# Altium PCB TuringSMD_BACK.PcbDoc
Units mil, origin at the board's own origin, x right, y up, seen from the top; angles counter-clockwise.
Board outline 1102.36 x 3937.01 mil, 2 copper layers (Top Layer, Bottom Layer); 22 components, 85 nets, 157 pads, 88 vias.
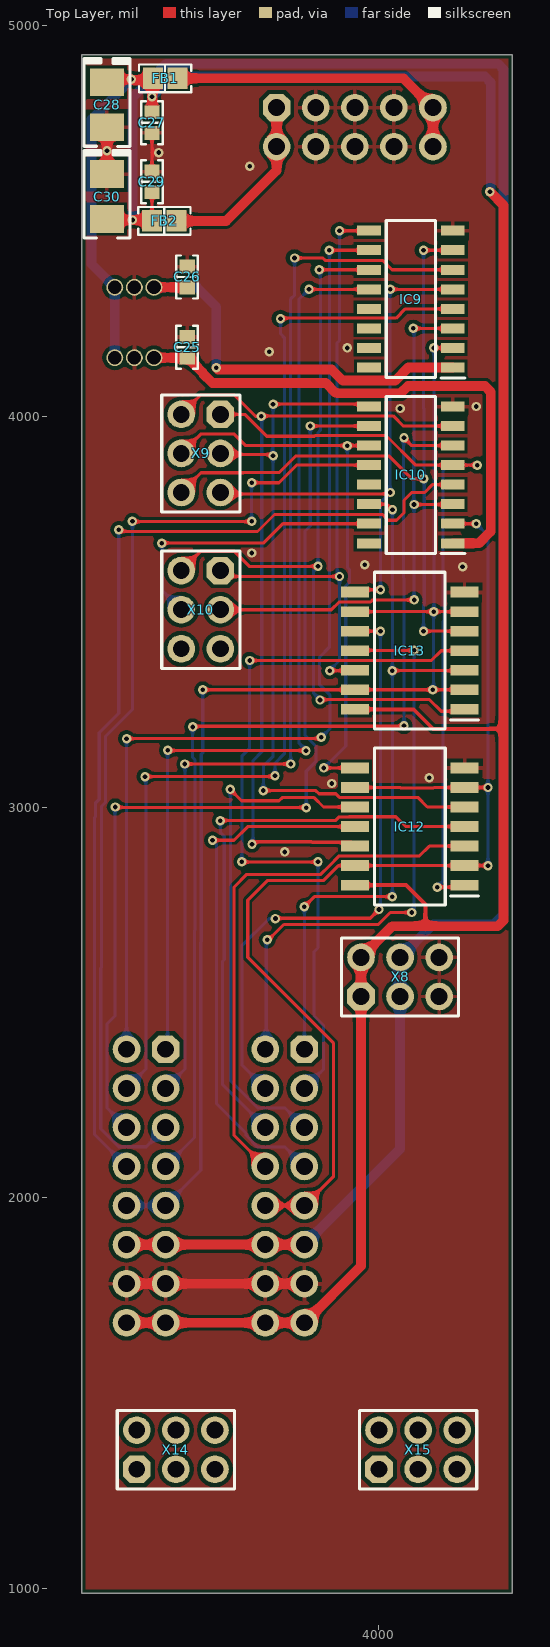
[diagram p0: Top Layer view]
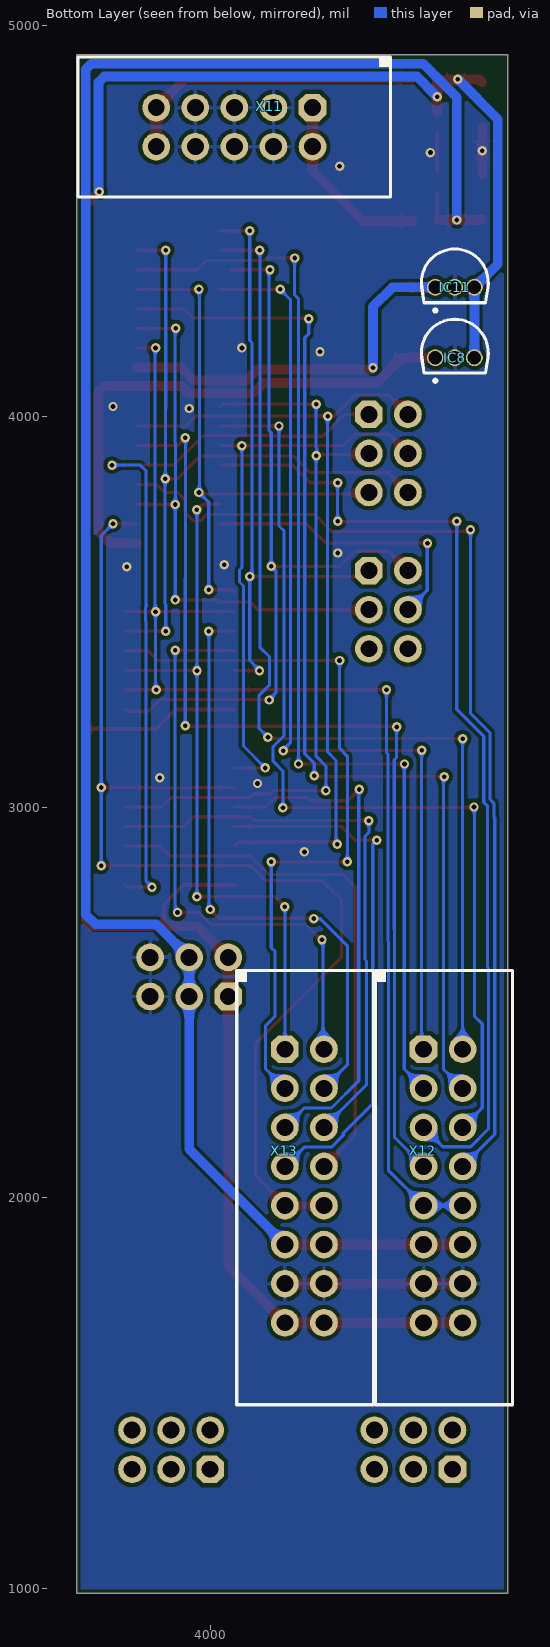
[diagram p1: Bottom Layer view, seen from below]
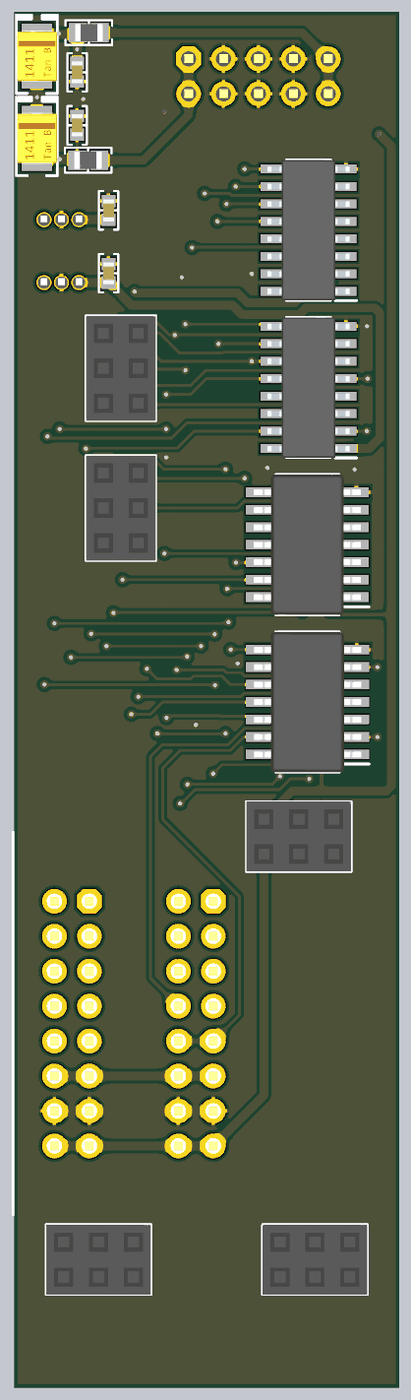
[diagram p2: 3D render of the assembled board from above, using the file's embedded part models]
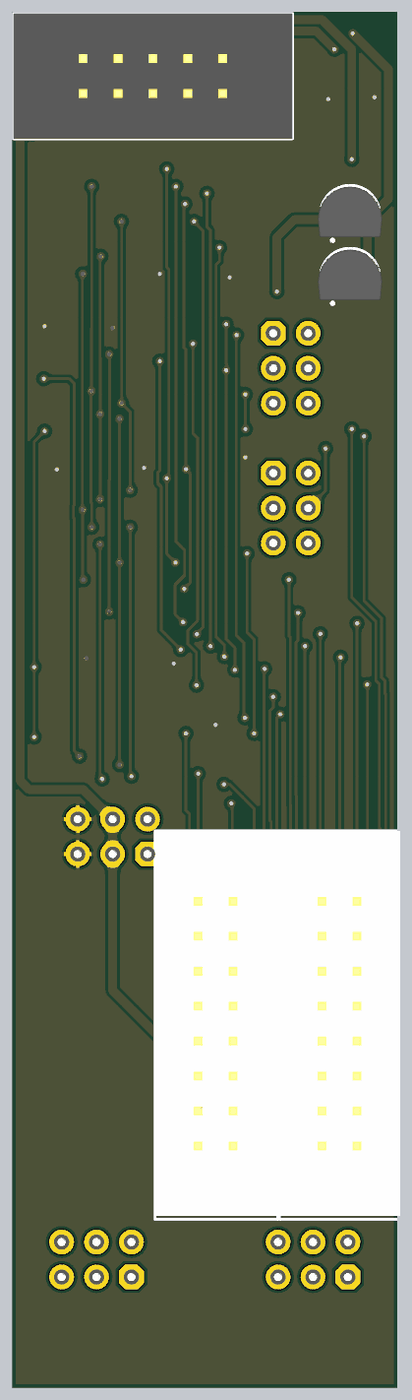
[diagram p3: 3D render of the assembled board from below, using the file's embedded part models]

## Layer stack, top to bottom
Top Solder: solder mask 0.4, Solder Resist, Dk 3.5
Top Layer: signal copper 1.4
Dielectric 1: dielectric 12.6, FR-4, Dk 4.8
Bottom Layer: signal copper 1.4
Bottom Solder: solder mask 0.4, Solder Resist, Dk 3.5

## Board outline
3240,987.99 4342.36,987.99 4342.36,4925 3240,4925

## Design rules (kind name [scope] priority, off if disabled: settings)
BoardOutlineClearance [All] p1: gap=10 ignorepadtopadclearanceinfootprint=FALSE except(0: Arc-SplitContinuation Track-SplitContinuation SMDPad-SplitContinuation THPad-SplitContinuation Via-SplitContinuation Fill-SplitContinuation Poly-SplitContinuation Region-SplitContinuation Text-SplitContinuation)
Clearance [All] p1: gap=10 ignorepadtopadclearanceinfootprint=FALSE except(7: Arc-SMDPad Track-SMDPad; 8: Arc-Arc Arc-Track Arc-Fill Arc-Poly Arc-Region Track-Track Track-Fill Track-Poly Track-Region SMDPad-SMDPad SMDPad-Fill SMDPad-Poly SMDPad-Region)
PolygonConnect [All] p1: thpad.connectstyle=Relief thpad.reliefconductorwidth=10 thpad.reliefentries=4 thpad.polygonreliefangle="90 Angle" thpad.airgapwidth=10 smdpad.connectstyle=Relief smdpad.reliefconductorwidth=10 smdpad.reliefentries=4 smdpad.polygonreliefangle="90 Angle" smdpad.airgapwidth=10 via.connectstyle=Direct via.reliefconductorwidth=10 via.reliefentries=4 via.polygonreliefangle="90 Angle" via.airgapwidth=10
RoutingVias [All] p1: holewidth=12 width=24 viastyle="Through Hole" minholewidth=12 minwidth=24 maxholewidth=12 maxwidth=24
SolderMaskExpansion [All] p1: expansion=4 istentingtop=FALSE
Width [All] p1: maxlimit=25 minlimit=8 preferedwidth=8
30 further rules are at their usual default settings.

## Classes and differential pairs
component class TuringSMD_back: C25 C26 C27 C28 C29 C30 FB1 FB2 IC8 IC9 IC10 IC11 IC12 IC13 X8 X9 X10 X11 X12 X13

## Components (designator, comment, footprint, x,y, rotation, side; value= is the part's Value field where it differs from the comment)
C25 "0.1 µF" "CAP 0603_1608" 3510,4176.57 r270 top
C26 "0.1 µF" "CAP 0603_1608" 3510,4356.57 r270 top
C27 "0.1 µF" "CAP 0603_1608" 3420,4751.57 r90 top
C28 "10µF" "CAP POL 1411_3528" 3305,4797.52 r270 top
C29 "0.1 µF" "CAP 0603_1608" 3420,4600 r90 top
C30 "10µF" "CAP POL 1411_3528" 3305,4562.52 r270 top
FB1 "470 Ohms @ 100MHz" "FER 0805_2012" 3453.5,4865 r0 top
FB2 "470 Ohms @ 100MHz" "FER 0805_2012" 3451.5,4500 r0 top
IC8 "L78L09ACZTR" TS1107A1AP 3425,4150 r180 bottom
IC9 "CD4050BD" SOIC127P600X175-16N 4082.72,4300 r180 top
IC10 "CD4050BD" SOIC127P600X175-16N 4082.72,3850 r180 top
IC11 "L78L09ACZTR" TS1107A1AP 3425,4330 r180 bottom
IC12 "CD4081BNSRG4" SOIC127P780X200-14N 4080,2950 r180 top
IC13 "CD4081BNSRG4" SOIC127P780X200-14N 4079.76,3400 r180 top
X8 "Connector, 6pin, 2.54mm, 500VAC, 3A" "CON: PBD-6"#1 4055,2565 r0 top
X9 "Connector, 6pin, 2.54mm, 500VAC, 3A" "CON: PBD-6"#2 3545,3905 r270 top
X10 "Connector, 6pin, 2.54mm, 500VAC, 3A" "CON: PBD-6"#2 3545,3505 r270 top
X11 "Connector, 10pin, 2.54mm, 250VAC, 3A" "CON: IDC-10MS" 3939.21,4740 r0 bottom
X12 "Connector, 16pin, 2.54mm, 250VAC, 3A" "CON: IDC-16MS" 3405,2030 r270 bottom
X13 "Connector, 16pin, 2.54mm, 250VAC, 3A" "CON: IDC-16MS" 3760,2030 r270 bottom
X14 "Connector, 6pin, 2.54mm, 500VAC, 3A" "CON: PBD-6"#1 3481.14,1355 r0 top (schematic designator X8)
X15 "Connector, 6pin, 2.54mm, 500VAC, 3A" "CON: PBD-6"#1 4101.22,1355 r0 top (schematic designator X8)

## Footprints (in the part's own frame and the unit in brackets; to place one, negate y for a bottom-side part, rotate by r counter-clockwise, add the part's x,y. Pads: shape width x height; smd on the part's side, far side on the other; paste and mask are expansions set on the pad)
"CAP 0603_1608" [mm] "Chip Capacitor, 2-Leads, Body 1.60x0.80mm, IPC Medium Density"
  rect 0.9x1 smd: 1(-0.675,0) 2(0.675,0)
  silkscreen extent -1.4,-0.7 1.4,0.7, body extent -0.8,-0.41 0.8,0.41, height 0.82
"CAP POL 1411_3528" [mm] "Molded Capacitor, 2-Leads, Body 3.50x2.80mm, IPC Medium Density"
  rect 1.8x2.23 smd: 1(-1.46,0) 2(1.46,0)
  silkscreen extent -3,-1.5 2.71,1.48, body extent -1.87,-1.45 1.86,1.45, height 2
"CON: IDC-10MS" [mm] "IDC-10MS 10 pin PCB-mount header"
  oct 1.8x1.8 hole 1.1: 1(-5.08,-1.27)
  round 1.8 hole 1.1: 2(-5.08,1.27) 3(-2.54,-1.27) 4(-2.54,1.27) 5(0,-1.27) 6(0,1.27) 7(2.54,-1.27) 8(2.54,1.27) 9(5.08,-1.27) 10(5.08,1.27)
  round 0.5 on Mech1: ""(-9.6,-4)
  silkscreen extent -10.14,-4.57 10.16,4.53, body extent -10.14,-4.57 10.16,4.53, height 9
"CON: IDC-16MS" [mm] "IDC-16MS straight leads pcb mount"
  oct 1.8x1.8 hole 1.1: 1(-8.89,-1.27)
  round 1.8 hole 1.1: 2(-8.89,1.27) 3(-6.35,-1.27) 4(-6.35,1.27) 5(-3.81,-1.27) 6(-3.81,1.27) 7(-1.27,-1.27) 8(-1.27,1.27) 9(1.27,-1.27) 10(1.27,1.27) 11(3.81,-1.27) 12(3.81,1.27) 13(6.35,-1.27) 14(6.35,1.27) 15(8.89,-1.27) 16(8.89,1.27)
  round 0.5 on Mech1: ""(-13.5,-3.9)
  silkscreen extent -14,-4.4 14.22,4.5, body extent -13.98,-4.4 13.99,4.4, height 9.1
"CON: PBD-6"#1 [mm] "PBD-6"
  oct 1.8x1.8 hole 1.1: 1(-2.54,-1.27)
  round 1.8 hole 1.1: 2(-2.54,1.27) 3(0,-1.27) 4(0,1.27) 5(2.54,-1.27) 6(2.54,1.27)
  silkscreen extent -3.81,-2.54 3.81,2.54, body extent -3.81,-2.54 3.81,2.54, height 8.5
"CON: PBD-6"#2 [mm] "PBD-6"
  oct 1.8x1.8 hole 1.1: 1(-2.54,1.27)
  round 1.8 hole 1.1: 2(-2.54,-1.27) 3(0,1.27) 4(0,-1.27) 5(2.54,1.27) 6(2.54,-1.27)
  silkscreen extent -3.81,-2.54 3.81,2.54, body extent -3.81,-2.54 3.81,2.54, height 8.5
"FER 0805_2012" [mm] "Chip Ferrite, 2-Leads, Body 2.00x1.20mm, IPC Medium Density"
  rect 1.3x1.4 smd: 1(-0.8,0) 2(0.8,0)
  silkscreen extent -1.7,-0.9 1.7,0.9, body extent -1,-0.64 1,0.64, height 1.26
SOIC127P600X175-16N [mm]
  rect 1.55x0.65 smd: 1(-2.725,4.445) 2(-2.725,3.175) 3(-2.725,1.905) 4(-2.725,0.635) 5(-2.725,-0.635) 6(-2.725,-1.905) 7(-2.725,-3.175) 8(-2.725,-4.445) 9(2.725,-4.445) 10(2.725,-3.175) 11(2.725,-1.905) 12(2.725,-0.635) 13(2.725,0.635) 14(2.725,1.905) 15(2.725,3.175) 16(2.725,4.445)
  silkscreen extent -3.5,-5.1 1.6,5.12, body extent -3,-5.1 3,5.1, height 1.75
SOIC127P780X200-14N [mm]
  rect 1.825x0.7 smd: 1(-3.562,3.81) 2(-3.562,2.54) 3(-3.562,1.27) 4(-3.562,0) 5(-3.562,-1.27) 6(-3.562,-2.54) 7(-3.562,-3.81) 8(3.562,-3.81) 9(3.562,-2.54) 10(3.562,-1.27) 11(3.562,0) 12(3.562,1.27) 13(3.562,2.54) 14(3.562,3.81)
  silkscreen extent -4.47,-5.1 2.3,5.1, body extent -3.9,-5.1 3.9,5.1, height 2
TS1107A1AP [mm]
  round 1.1 hole 0.89: 1(0,0) 2(1.27,0) 3(2.54,0)
  silkscreen extent -0.9,-1.6 3.44,2.5, body extent -1.08,-1.29 3.62,2.41, height 7.2

## Part data
C25 C26 C27 C29: library part C0603C104K5RAC7411, "CAP CER 0.1UF 50V X7R 0603", Device Package="0603 (1608 Metric)", Manufacturer=KEMET, Operating Temperature="-55°C ~ 125°C", Supplier Part Number 1=399-C0603C104K5RAC7411CT-ND, Temperature Coefficient=X7R, Tolerance=±10%, Voltage - Rated=50V, Applications="Bypass, Decoupling", Capacitance="0.1 µF", ComponentLink1Description=Datasheet, ComponentLink1URL=https://api.kemet.com/component-edge/download/datasheet/C0603C104K5RAC7411.pdf, ComponentLink2Description="DigiKey Link", ComponentLink2URL=https://www.digikey.com/en/products/detail/kemet/C0603C104K5RAC7411/3317013, LastUpdated="2/9/2024 8:10:30 PM", Lifecycle Status=Active, Minimum Order=1, Mounting Type="Surface Mount, MLCC", Package / Case="0603 (1608 Metric)", Packaging=TapeAndReel, Part Number=C0603C104K5RAC7411, Part Status=Active, PartId=2233, Price=0.01, Series="SMD Comm X7R", Size / Dimension="0.063\" L x 0.031\" W (1.60mm x 0.80mm)", Supplier 1=DigiKey, Thickness (Max)="0.035\" (0.90mm)"
C28 C30: library part TAJB106K025RNJ, "CAP TANT 10UF 10% 25V 1411", ESR (Equivalent Series Resistance)=2.5Ohm, Manufacturer="AVX Corporation", Manufacturer Size Code=B, Operating Temperature="-55°C ~ 125°C", Package / Case="1411 (3528 Metric), 1210", Supplier Part Number 1=478-5257-1-ND, Tolerance=±10%, Voltage - Rated=25V, Capacitance=10µF, ComponentLink1Description=Datasheet, ComponentLink1URL=http://datasheets.avx.com/TAJ.pdf, ComponentLink2Description="DigiKey Link", ComponentLink2URL=http://digikey.com/product-detail/en/avx-corporation/TAJB106K025RNJ/478-5257-1-ND/1950924, Features="General Purpose", Height - Seated (Max)="0.083\" (2.10mm)", LastUpdated="9/2/2020 1:15:45 AM", Lifecycle Status=Active, Minimum Order=1, Mounting Type="Surface Mount", Packaging=TapeAndReel, Part Number=TAJB106K025RNJ, Part Status=Active, PartId=206, Price=0.16, Series=TAJ, Size / Dimension="0.138\" L x 0.110\" W (3.50mm x 2.80mm)", Supplier 1=DigiKey, Type=Molded
FB1 FB2: library part BLM21SP471SH1D, "FERRITEBEAD SMD Z100MHZ=470OHM 2", Current Rating (Max)=2.5A, Device Package="0805 (2012 Metric)", Manufacturer="Murata Electronics", Operating Temperature="-55°C ~ 125°C", Ratings=AEC-Q200, Supplier Part Number 1=490-18587-1-ND, ComponentLink1Description=Datasheet, ComponentLink1URL=https://www.murata.com/en-us/api/pdfdownloadapi?cate=luNoiseSupprFilteChipFerriBead&partno=BLM21SP471SH1%23, ComponentLink2Description="DigiKey Link", ComponentLink2URL=http://digikey.com/product-detail/en/murata-electronics/BLM21SP471SH1D/490-18587-1-ND/10135598, Filter Type="Power Line", Height (Max)="0.041\" (1.05mm)", Impedance @ Frequency="470 Ohms @ 100MHz", LastUpdated="9/2/2020 1:18:23 AM", Lifecycle Status=Active, Minimum Order=1, Mounting Type="Surface Mount", Number of Lines=1, Package / Case="0805 (2012 Metric)", Packaging=TapeAndReel, Part Number=BLM21SP471SH1D, Part Status=Active, PartId=1234, Price=0.09, Series="EMIFIL®, BLM21", Size / Dimension="0.079\" L x 0.049\" W (2.00mm x 1.25mm)", Supplier 1=DigiKey
IC8 IC11: "Integrated Circuit", Manufacturer_Name=STMicroelectronics, Datasheet Link=https://datasheet.datasheetarchive.com/originals/distributors/Datasheets-302/26642.pdf, Height=4.95mm, Manufacturer_Part_Number=L78L09ACZTR
IC9 IC10: "Integrated Circuit", Manufacturer_Name="Texas Instruments", Mouser Part Number=595-CD4050BD, Arrow Part Number=CD4050BD, Arrow Price/Stock=https://www.arrow.com/en/products/cd4050bd/texas-instruments?region=nac, Datasheet Link=http://www.ti.com/lit/gpn/cd4050b, Height=1.75mm, Manufacturer_Part_Number=CD4050BD, Mouser Price/Stock=https://www.mouser.co.uk/ProductDetail/Texas-Instruments/CD4050BD?qs=KIIz7VjqD7KKcecgSZzn4w%3D%3D
IC12 IC13: "Integrated Circuit", Manufacturer_Name="Texas Instruments", Mouser Part Number=595-CD4081BNSRG4, Datasheet Link=https://www.ti.com/lit/gpn/cd4081b, Height=2mm, Manufacturer_Part_Number=CD4081BNSRG4, Mouser Price/Stock=https://www.mouser.com/Search/Refine.aspx?Keyword=595-CD4081BNSRG4
X8 X9 X10 X14 X15: library part PBD-6, CurrentMax=3A, Manufacturer=Connfly, VoltageMax=500VAC, CommentText="\"Разъем\"", helpurl=https://www.chipdip.ru/product/pbd-6, Multichannel=6pin, PartNumber=PBD-6, Pitch=2.54mm, TypeConnector=Connector, ValueManufacturerPartNumber="Connector, 6pin, 2.54mm, 500VAC, 3A"
X11: library part IDC-10, CurrentMax=3A, Manufacturer=Connfly, VoltageMax=250VAC, CommentText="\"Разъем\"", helpurl=https://www.chipdip.ru/product/idc-10ms, Multichannel=10pin, PartNumber=IDC-10, Pitch=2.54mm, TypeConnector=Connector, ValueManufacturerPartNumber="Connector, 10pin, 2.54mm, 250VAC, 3A"
X12 X13: library part IDC-16, CurrentMax=3A, Manufacturer=Connfly, VoltageMax=250VAC, CommentText="\"Разъем\"", helpurl=https://www.chipdip.ru/product/idc-16ms, Multichannel=16pin, PartNumber=IDC-16, Pitch=2.54mm, TypeConnector=Connector, ValueManufacturerPartNumber="Connector, 16pin, 2.54mm, 250VAC, 3A"

## Via types
v1: diameter 24, hole 12, Top Layer to Bottom Layer, tented both sides, 88 vias

## Nets (pads, with @x,y where several pads share a name; then routed paths per layer and width w, separated by ;. In a path a pad name is that pad's centre, name@x,y a point inside that pad or via, vN(x,y) a via of type N, cw(c..) or ccw(c..) an arc to the next point about the centre after c; other vN are vias at no path point)
+9_1: C25.2 IC8.1 IC10.1 | length 1381.6
  Top Layer w25: IC8.1 C25.2 3511.97,4150 3549.9,4112.07 3549.9,4110.1 3575,4085 3865,4085 3890,4060 3893.33,4060 3894.42,4058.92 4056.58,4058.92 4075.11,4077.45 4272.22,4077.45 4286.86,4062.81 4286.86,3705 4256.86,3675 IC10.1
+9_2: C26.2 IC9.1 IC11.1 | length 1053.8
  Top Layer w25: IC11.1 C26.2 ; v1(3584.4,4124.4) 3588.79,4120 3880,4120 3908.08,4091.92 4042.91,4091.92 4075.99,4125 IC9.1
  Bottom Layer w25: IC11.1 3535,4330 3584.4,4280.6 v1(3584.4,4124.4)
+12: C27.2 C28.1 FB1.1 IC8.3 IC11.3 IC12.14 IC13.14 X8.1 X8.2 X12.15 X12.16 X13.15 X13.16 | length 6585.5
  Top Layer w8: C27.2 v1(3420,4817.58)
  Top Layer w10: IC13.14 4090,3250 4140,3200 4319.86,3200 ; IC12.14 4070,2800 4120,2750 4120,2695
  Top Layer w25: C28.1 3312.58,4862.58 v1(3367.42,4862.58) ; X12.16 X12.15 X13.16 X13.15 3955,1825 X8.1 X8.2 4035,2695 4120,2695 4305.22,2695 4319.86,2709.64 4319.86,3200 4319.86,4540.14 v1(4285,4575) ; v1@3370,4860 FB1.1@3417.01,4860 ; C27.2 3421,4779.15 3421,4864 FB1.1
  Bottom Layer w25: IC8.3 IC11.3 3265,4390 3265,4760.16 v1(3367.42,4862.58) ; v1(3420,4817.58) 3471.92,4869.5 4272.22,4869.5 4286.86,4854.86 4286.86,4576.86 v1(4285,4575)
+12_IDC: FB1.2 X11.9 X11.10 | length 785.3
  Top Layer w25: FB1.2 4064.21,4865 X11.9 X11.10
-12: C29.1 C30.2 FB2.1 X8.3 X8.4 X12.11 X12.12 X13.11 X13.12 | length 5255.7
  Top Layer w8: FB2.1@3417.48,4502.52 3420,4505.04 C29.1
  Top Layer w25: C30.2 3307.52,4502.52 v1(3370,4502.52) FB2.1@3417.48,4502.52 ; X12.12 X12.11 X13.12 X13.11
  Bottom Layer w25: v1(3370,4502.52) 3370,4816.37 3456.13,4902.5 4305.22,4902.5 4319.86,4887.86 4319.86,2725 4294.86,2700 4140,2700 X8.4 X8.3 4055,2125 X13.11
-12_IDC: FB2.2 X11.1 X11.2 | length 470.5
  Top Layer w25: FB2.2 3610,4500 3739.21,4629.21 X11.2 X11.1
B1: IC10.5 IC12.1 X9.1 | length 1951.9
  Top Layer w8: X9.1 3657.37,4005 3713.37,3949 3835.77,3949 3837.77,3951 4019,3951 4095,3875 v1(4252.36,3875) ; v1(4150,2795) 4215.24,2795 IC12.1
  Bottom Layer w8: v1(4150,2795) 4165,2810 4165,3475 4167,3477 4167,3510.77 4164.7,3513.07 4164.7,3519.7 4165,3520 4165,3860 4180,3875 v1(4252.36,3875)
B2: IC10.7 IC12.12 X9.2 | length 2125.8
  Top Layer w8: X9.2 3544.43,4054.43 3630.57,4054.43 3685,4000 v1(3700,4000) 3701,4001 4037.23,4001 4063.23,3975 IC10.7 ; v1(3676,2905) 3680.33,2905 3686.33,2911 3827.92,2911 3829.14,2909.78 3929.98,2909.78 IC12.12
  Bottom Layer w8: v1(3676,2905) 3676,2906 3679,2909 3679,3119 3701,3141 3701,3999 v1(3700,4000)
B3: IC10.9 IC12.5 X9.3 | length 1918.8
  Top Layer w8: X9.3 3597.5,3902.5 3726.5,3902.5 v1(3730,3899) ; v1(3705,3042) 3839.63,3042 3847.63,3034 3890.5,3034 3899.72,3024.78 4100.22,3024.78 4125,3000 IC12.5 ; v1(3730,4031) 3969.43,4031 IC10.9
  Bottom Layer w8: v1(3705,3042) 3705,3105 3730,3130 3730,3900 3728.31,3901.69 3728.31,3918.31 3730,3920 v1(3730,4031)
B4: IC10.11 IC12.8 X9.4 | length 1447.7
  Top Layer w8: X9.4 3544.43,3954.43 3630.57,3954.43 3660,3925 v1(3920,3925) IC10.11 ; v1(3860,3100) IC12.8
  Bottom Layer w8: v1(3860,3100) 3916,3156 3916,3565.81 3926,3575.81 3926,3606.62 3920,3612.62 v1(3920,3925)
B5: IC9.5 IC13.8 X9.5 | length 1446.3
  Top Layer w8: X9.5 3598.8,3801.2 4021.88,3801.2 4025.67,3805 v1(4030,3805) ; IC13.8 3945.53,3556 v1(4005,3556) ; v1(4030,4325) IC9.5
  Bottom Layer w8: v1(4005,3556) 4005,3780 v1(4030,3805) 4029,3806 4029,4324 v1(4030,4325)
B6: IC9.7 IC13.5 X9.6 | length 1840.9
  Top Layer w8: X9.6 3545.57,3855.57 3654.07,3855.57 3654.51,3856 3746,3856 3788.8,3898.8 4026.2,3898.8 4085,3840 v1(4116,3840) ; v1(4115,3450) IC13.5 ; v1(4115,4425) IC9.7
  Bottom Layer w8: v1(4115,3450) 4115,3517.23 4117,3519.23 4117,3839 v1(4116,3840) 4116,4019.34 4115,4020.34 v1(4115,4425)
B7: IC9.9 IC13.12 X10.1 | length 1592.9
  Top Layer w8: X10.1 3610,3590 v1(3900,3590) ; v1(3875,3349) 3938.53,3349 IC13.12 ; v1(3900,4475) IC9.9
  Bottom Layer w8: v1(3875,3349) 3875,3350 3900,3375 3900,3594.33 3894,3600.33 3894,4187.92 3900,4193.92 v1(3900,4475)
B8: IC9.11 IC13.1 X10.2 | length 1989.4
  Top Layer w8: X10.2 3544.43,3654.43 3630.57,3654.43 3669,3616 v1(3845,3616) ; v1(3848,4375) IC9.11@3950.43,4375 ; v1(3850,3274) 3850.78,3274.78 4130.22,3274.78 4160,3245 4215,3245 IC13.1
  Bottom Layer w8: v1(3845,3616) 3833,3604 3833,3292 3850,3275 v1(3850,3274) ; v1@3846.5,3617.5 3845,3619 3845,3958.23 3851,3964.23 3851,4372 v1(3848,4375)
BUFFCLK1: IC10.2 IC12.2 IC12.6 IC12.9 IC12.13 X13.9 X13.10 | length 2944
  Top Layer w8: X13.10 X13.9 3885,2055 3885,2395 3665,2615 3665,2761.75 3714.69,2811.43 3858.57,2811.43 3897.13,2850 IC12.13 IC12.2 v1(4280,2850) ; IC12.9 4055.73,3050 4056.73,3049 4140.77,3049 4141.77,3050 v1(4280,3050) ; IC10.2 v1(4250,3725)
  Bottom Layer w8: v1(4250,3725) 4280,3695 v1(4280,3050) v1(4280,2850)
BUFFCLK2: IC9.2 IC13.2 IC13.6 IC13.9 IC13.13 X12.9 X12.10 | length 3335.5
  Top Layer w8: v1(3550,3300) IC13.13 v1(4139,3300) IC13.2 ; IC13.9 v1(4141,3500) IC13.6 ; v1(4141,4175) IC9.2
  Bottom Layer w8: X12.10 X12.9 3545,2070 3545,2654.5 3546,2655.5 3546,3135 3550,3139 v1(3550,3300) ; v1(4139,3300) 4141,3302 v1(4141,3500) 4142,3501 4142,4174 v1(4141,4175)
CHANGE_B: 
CHANGE_T: 
CHANGE_W: 
CLK: IC9.3 IC10.3 X10.3 | length 1404
  Top Layer w8: X10.3 3879.27,3505 3899.05,3524.78 3979.57,3524.78 3984.79,3530 v1(4091,3530) ; v1(4089,4225) IC9.3 ; v1(4090.88,3774.12) 4189.12,3774.12 IC10.3
  Bottom Layer w8: v1(4089,4225) 4091,4223 4091,3934.23 4090,3933.23 4090,3775 v1(4090.88,3774.12) ; v1@4090.5,3774.5 4090.5,3530.5 v1(4091,3530)
G1: IC9.12 X12.1 | length 2474.1
  Top Layer w8: v1(3460,3145) 3460.44,3144.56 3813.67,3144.56 v1(3814.12,3144.12) ; v1(3822,4325) IC9.12
  Bottom Layer w8: X12.1 3460,2385 v1(3460,3145) ; v1(3814.12,3144.12) 3814.12,3145.88 3796,3164 3796,4299 v1(3822,4325)
G2: IC9.10 X12.2 | length 2686.2
  Top Layer w8: v1(3355,3175) 3850,3175 v1(3853.38,3178.38) ; v1(3874,4425) IC9.10
  Bottom Layer w8: X12.2 3365,2390 3350,2405 3355,2410 v1(3355,3175) ; v1(3853.38,3178.38) 3876,3201 3876,3285.77 3849,3312.77 3849,3384 3874,3409 v1(3874,4425)
G3: IC9.6 X12.3 | length 2838.2
  Top Layer w8: v1(3504,3110) v1(3775,3110) ; v1(3785,4405) 3857.23,4405 3863.23,4399 4010.3,4399 4034.3,4375 IC9.6
  Bottom Layer w8: X12.3 3504.43,2329.43 3504.43,3109.57 v1(3504,3110) ; v1(3775,3110) 3775,4300.63 3785,4310.63 v1(3785,4405)
G4: IC9.4 X12.4 | length 2788.3
  Top Layer w8: v1(3402.22,3077.78) 3732.78,3077.78 v1(3735,3080) ; v1(3749,4250) 3750.2,4251.2 4044.85,4251.2 4068.64,4275 IC9.4
  Bottom Layer w8: X12.4 3404.43,2329.43 3404.43,3075.57 v1(3402.22,3077.78) ; v1(3735,3080) 3735,3112.16 3759,3136.16 3759,4201 3749,4211 v1(3749,4250)
G5: IC10.12 X12.5 | length 2517.1
  Top Layer w8: v1@3370,3730.5 3674.5,3730.5 v1(3675,3731) ; v1(3675,3830) 3745,3830 3790,3875 IC10.12
  Bottom Layer w8: v1(3370,3731) 3370,3250 3301,3181 3301,3011.77 3291,3001.77 3291,2589.93 3289,2587.93 3289,2176.09 3334.52,2130.57 3405.57,2130.57 X12.5 ; v1(3675,3731) v1(3675,3830)
G6: IC10.10 X12.6 | length 2494.1
  Top Layer w8: v1(3326,3000) 3327,2999 3814,2999 v1(3815,2998) ; v1(3825,3975) IC10.10
  Bottom Layer w8: v1(3326,3000) 3325,2999 3325,2465 3305,2445 3305,2230 X12.6 ; v1(3815,2998) 3815,3091.77 3840.12,3116.88 3840.12,3154.88 3812,3183 3812,3706.34 3825,3719.34 v1(3825,3975)
G7: IC10.6 X12.7 | length 2571.9
  Top Layer w8: v1(3524,3205) 3525.53,3206.53 4063.47,3206.53 v1(4065,3208.06) ; v1(4065,3945) 4085,3925 IC10.6
  Bottom Layer w8: X12.7 3529,2154 3529,2683.81 3530,2684.81 3530,3120.77 3524,3126.77 v1(3524,3205) ; v1(4065,3208.06) 4065,3585 4064,3586 4064,3944 v1(4065,3945)
G8: IC10.4 X12.8 | length 2627.9
  Top Layer w8: v1(3335,3710) 3340,3705 3690,3705 3733.8,3748.8 4010.5,3748.8 4016.54,3742.75 ; 4016.55,3742.72 4016.55,3741.68 4024.23,3734 4045.77,3734 4064.88,3753.12 4064.88,3784.88 4085,3805 4117.77,3805 4137.77,3825 IC10.4
  Bottom Layer w8: v1(3335,3710) 3335,3240 3285,3190 3285,3020 3275,3010 3275,2975 3273,2973 3273,2162 X12.8
GND: C25.1 C26.1 C27.1 C28.2 C29.2 C30.1 IC8.2 IC9.8 IC10.8 IC11.2 IC12.7 IC13.7 X8.5 X8.6 X11.3 X11.4 X11.5 X11.6 X11.7 X11.8 X12.13 X12.14 X13.13 X13.14 | length 691
  Top Layer w8: C29.2 3420,4675 ; C27.1 3420,4675 ; v1(3437.5,4675) 3420,4675
  Top Layer w25: C30.1 v1(3305,4680.02) C28.2 ; X12.14 X12.13 X13.14 X13.13
  other v1: 3760,2885 3880,3060 4130,3075 4215,3615 3965,3620 3675,3650 4055,4020 4250,4025 3720,4165 3920,4175 3670,4640
NetC1_1: 
NetC2_1: 
NetC2_2: 
NetC3_1: 
NetC3_2: 
NetC4_1: 
NetC5_2: 
NetC7_2: 
NetC8_2: 
NetC9_1: 
NetC10_2: 
NetC11_2: 
NetD1_1: 
NetD2_2: 
NetD3_2: 
NetD4_2: 
NetD5_2: 
NetD6_2: 
NetD7_2: 
NetD8_2: 
NetD9_2: 
NetD10_1: 
NetD11_1: 
NetIC1_2: 
NetIC2_1: 
NetIC2_2: 
NetIC2_7: 
NetIC3_1: 
NetIC3_2: 
NetIC3_3: 
NetIC3_5: 
NetIC3_12: 
NetIC4_2: 
NetIC4_3: 
NetIC5_1: 
NetIC7_10: 
NetJ1_3: 
NetJ2_3: 
NetJ3_3: 
NetR3_2: 
NOISE: 
P1: IC10.14 IC13.3 X13.1 | length 1842.4
  Top Layer w8: v1(3810,2745) 3835.52,2770.52 v1(4035.17,2770.52) ; IC10.14 4020,3775 4034.48,3760.52 v1(4035.52,3760.52) ; v1(4035,3349) 4219,3349 IC13.3
  Bottom Layer w8: X13.1 v1(3810,2745) ; v1(4035.17,2770.52) 4035.17,3760.17 v1(4035.52,3760.52)
P2: IC13.11 X13.2 | length 1506.4
  Top Layer w8: v1(3715,2660) 3718.38,2660 3757.57,2699.2 3999.44,2699.2 4030.24,2730 v1(4085,2730) ; IC13.11 3940.53,3401 v1(4091,3401)
  Bottom Layer w8: X13.2 3712.5,2382.5 3712.5,2657.5 v1(3715,2660) ; v1(4085,2730) 4091,2736 v1(4091,3401)
P3: IC13.4 X13.3 | length 1894.2
  Top Layer w8: v1(3650,2860) 3651,2859 3844,2859 v1(3845,2860) ; v1(3670,3375) 4135,3375 4160,3400 IC13.4
  Bottom Layer w8: v1(3650,2860) 3650,3130 3670,3150 v1(3670,3375) ; X13.3 3859.43,2329.43 3859.43,2440.57 3835,2465 3835,2630 3845,2640 v1(3845,2860)
P4: IC13.10 X13.4 | length 1558.8
  Top Layer w8: v1(3736,2714.39) 3736.8,2715.2 3978.67,2715.2 v1(4001.17,2737.7) ; IC13.10 v1(4005,3450)
  Bottom Layer w8: X13.4 3650,2340 3650,2645 3719.39,2714.39 v1(3736,2714.39) ; v1(4001.17,2737.7) 4004.49,2741.01 4004.49,3449.49 v1(4005,3450)
P5: IC12.10 X13.5 | length 1329.7
  Top Layer w8: v1(3620,3045) 3649,3016 3745,3016 3753,3024 3835,3024 3859,3000 IC12.10
  Bottom Layer w8: v1(3620,3045) 3621,3044 3621,2299.09 3690.66,2229.43 3760.57,2229.43 X13.5
P6: IC12.4 X13.6 | length 1475.7
  Top Layer w8: v1(3595,2965) 3595.8,2965.8 3890.3,2965.8 3899.28,2974.78 3924.78,2974.78 3925,2975 4044.16,2975 4069.16,2950 IC12.4
  Bottom Layer w8: v1(3595,2965) 3595,2935 3605,2925 3605,2610 3601,2606 3601,2289 X13.6
P7: IC12.11 X13.7 | length 1352.6
  Top Layer w8: v1(3575,2915) 3630,2915 3664.8,2949.8 3939.56,2949.8 IC12.11
  Bottom Layer w8: v1(3575,2915) 3585,2905 3585,2240.57 3660.57,2165 3660.57,2159.52 3690.66,2129.43 3760.57,2129.43 X13.7
P8: IC12.3 X13.8 | length 1381.9
  Top Layer w8: X13.8 3630,2160 3630,2795 3662.43,2827.43 3851.94,2827.43 3873.03,2848.52 3899.28,2874.78 4104.78,2874.78 4130,2900 IC12.3
PULSE_OUT: IC10.15 X10.4 | length 741.9
  Top Layer w8: v1(3445,3675) 3446,3676 3706,3676 3755,3725 IC10.15
  Bottom Layer w8: v1(3445,3675) 3445.57,3674.43 3445.57,3554.43 X10.4
SCALE_B: 
SCALE_T: 
SCALE_W: 
STEP12: 
STEP16: 
WRITE_SW: 
pads on no net: IC9.13 IC9.14 IC9.15 IC9.16 IC10.13 IC10.16 X10.5 X10.6 X11. X12. X13. X14.1 X14.2 X14.3 X14.4 X14.5 X14.6 X15.1 X15.2 X15.3 X15.4 X15.5 X15.6

## Polygon pours and split planes (outlines as drawn)
GND on Bottom Layer "NONET_L01_P-001" (solid, remove dead copper, pour order 0): 3240,4925 3240,985 4340,985 4345,990 4345,4925
GND on Top Layer "NONET_L01_P-001" (solid, remove dead copper, pour order 1): 3240,4925 3240,985 4340,985 4345,990 4345,4925

## Silkscreen, mask and mechanical layers (free items; w line width, h text height)
Board Shape:
  the board outline again, w1